# Altium PCB TYPEC_4KRECEIVER-v1.0.PcbDoc (part 3 of 12)
Units mil, origin at the board's own origin, x right, y up, seen from the top; angles counter-clockwise.
Board outline 2834.7 x 1259.84 mil, 10 copper layers (Top Layer, GND-1, Signal L1, GND-2, PWR-1, PWR-2, GND-3, Signal L2, GND-4, Bottom Layer), stack 61.686 mil thick; 492 components, 339 nets, 2214 pads, 1169 vias.
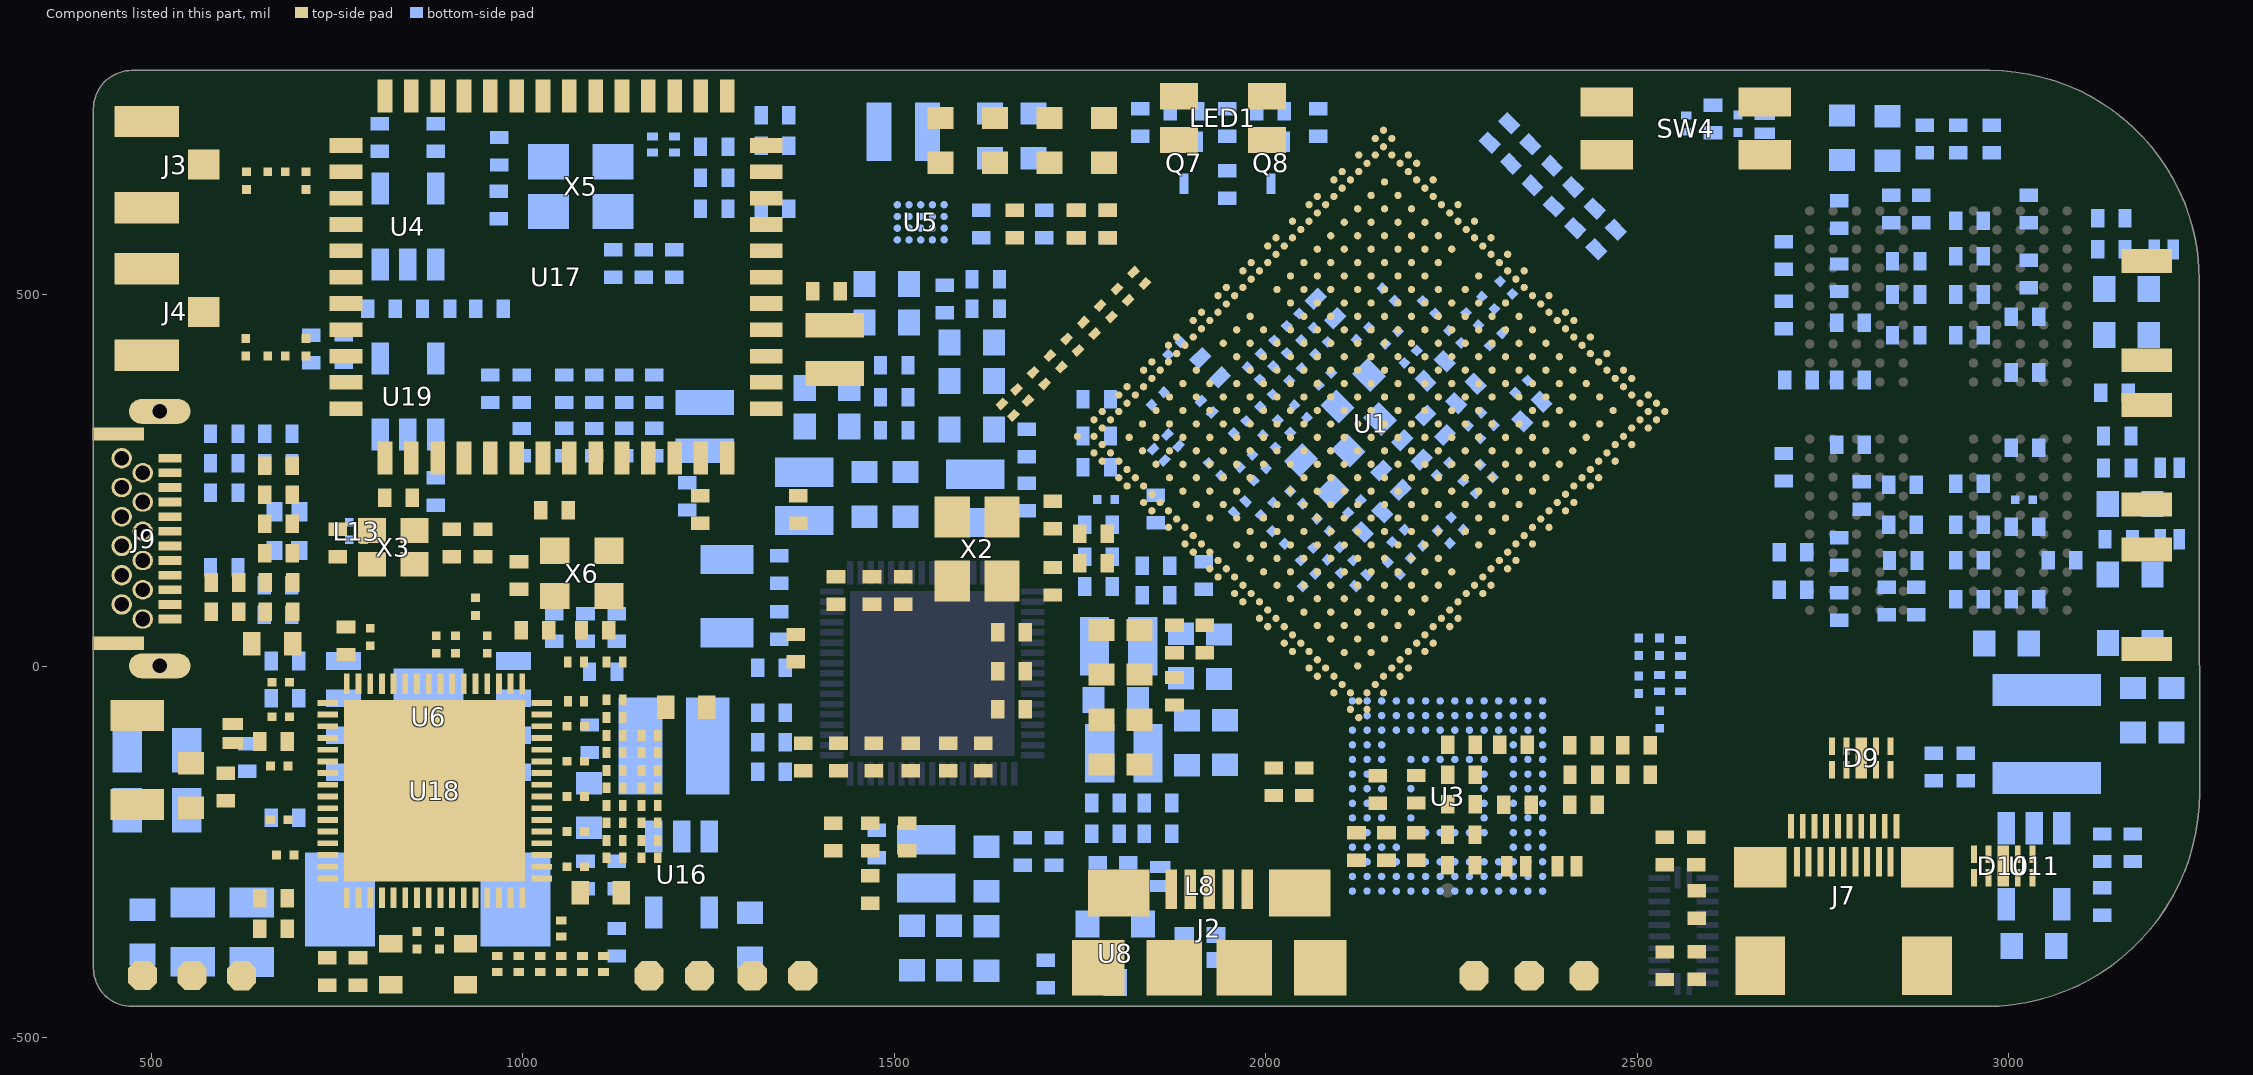
[diagram p10: the components of this part, seen from the top]

## Part data (continued)
C85: library part HGC0603R5226M160NTHJ, "16V 22uF X5R ±20% 0603 Multilayer Ceramic Capacitors MLCC - SMD/SMT ROHS", LCSC Part Number=C22367828, Manufacturer=Chinocera, Package=0603, ComponentLink1Description=LCSC, ComponentLink1URL=https://www.lcsc.com/product-detail/Multilayer-Ceramic-Capacitors-MLCC-SMD-SMT_Chinocera-HGC0603R5226M160NTHJ_C22367828.html, Item Type=Capacitor, Manufacturer Part Number=HGC0603R5226M160NTHJ
C121 C149 C169 C174: library part CC0201MRX5R6BB105, "CAP CER 1UF 10V X5R 0201", LCSC Part Number=C605210, Manufacturer=Yageo, Supplier Part Number=311-3474-1-ND, Category="Ceramic Capacitors", ComponentLink1Description=https://datasheet.octopart.com/CC0201MRX5R6BB105-Yageo-datasheet-158238148.pdf?src-supplier=Farnell, ComponentLink1URL=https://datasheet.octopart.com/CC0201MRX5R6BB105-Yageo-datasheet-158238148.pdf?src-supplier=Farnell, ComponentLink2Description=http://www.yageo.com/documents/recent/UPY-GPHC_X5R_4V-to-50V_25.pdf?src-supplier=Digi-Key, ComponentLink2URL=http://www.yageo.com/documents/recent/UPY-GPHC_X5R_4V-to-50V_25.pdf?src-supplier=Digi-Key, ComponentLink3Description=https://datasheet.octopart.com/CC0201MRX5R6BB105-Yageo-datasheet-137700082.pdf?src-supplier=Future+Electronics, ComponentLink3URL=https://datasheet.octopart.com/CC0201MRX5R6BB105-Yageo-datasheet-137700082.pdf?src-supplier=Future+Electronics, Item Type=Capacitor, Manufacturer Part Number=CC0201MRX5R6BB105, Pricing="1=0.19, 10=0.135, 50=0.0764, 100=0.0633, 500=0.04436, 1000=0.03672, 2500=0.03418, 5000=0.03127 (USD)", RoHS=Yes, Stock=772400, Supplier=Digi-Key
C129 C130: library part GCM1555C1H180GA16D, "CAP CER 18PF 50V C0G/NP0 0402", Case Code (Imperial)=0402, Case Code (Metric)=1005, LCSC Part Number=C882583, Manufacturer=Murata, Max Operating Temperature=125°C, Min Operating Temperature=-55°C, Ratings=AEC-Q200, Supplier Part Number=2477793P, Tolerance=2%, Voltage Rating=50V, Case/Package=0402, Category="Ceramic Capacitors", ComponentLink1Description=http://search.murata.co.jp/Ceramy/image/img/A01X/G101/ENG/GCM1555C1H180GA16-01.pdf?src-supplier=Digi-Key, ComponentLink1URL=http://search.murata.co.jp/Ceramy/image/img/A01X/G101/ENG/GCM1555C1H180GA16-01.pdf?src-supplier=Digi-Key, ComponentLink2Description=https://search.murata.co.jp/Ceramy/image/img/A01X/G101/ENG/GCM1555C1H180GA16-01.pdf?src-supplier=Digi-Key, ComponentLink2URL=https://search.murata.co.jp/Ceramy/image/img/A01X/G101/ENG/GCM1555C1H180GA16-01.pdf?src-supplier=Digi-Key, ComponentLink3Description=https://datasheet.octopart.com/GCM1555C1H180GA16D-Murata-datasheet-149522315.pdf?src-supplier=Newark, ComponentLink3URL=https://datasheet.octopart.com/GCM1555C1H180GA16D-Murata-datasheet-149522315.pdf?src-supplier=Newark, ComponentLink4Description=https://datasheet.octopart.com/GCM1555C1H180GA16D-Murata-datasheet-12511495.pdf?src-supplier=TME, ComponentLink4URL=https://datasheet.octopart.com/GCM1555C1H180GA16D-Murata-datasheet-12511495.pdf?src-supplier=TME, Item Type=Capacitor, Manufacturer Part Number=GCM1555C1H180GA16D, Mounting Technology="Surface Mount", Packaging="Cut Tape", Pricing="500=0.013, 5000=0.009 (GBP)", RoHS=Yes, RoHS Compliant=Yes, Series=GCM, Stock=10000, Supplier=Rs
C138: library part CC0402JRX7R7BB104, "CAP CER 0.1UF 16V X7R 0402", Case Code (Imperial)=0402, Case Code (Metric)=1005, Dielectric=X7R, LCSC Part Number=C541464, Manufacturer=Yageo, Max Operating Temperature=125°C, Min Operating Temperature=-55°C, Package Quantity=10000, Supplier Part Number=311-1676-1-ND, Tolerance=5%, Voltage Rating=16V, Case/Package=0402, Category="Ceramic Capacitors", ComponentLink1Description=https://datasheet.ciiva.com/13210/upy-gphc-x7r-6-3v-to-50v-8-12304-13210152.pdf?src-supplier=Mouser, ComponentLink1URL=https://datasheet.ciiva.com/13210/upy-gphc-x7r-6-3v-to-50v-8-12304-13210152.pdf?src-supplier=Mouser, Construction=Flat, Halogen Free="Halogen Free", Height=0.5mm, Item Type=Capacitor, Lead Free="Lead Free", Length=0.039inch, Manufacturer Part Number=CC0402JRX7R7BB104, Material=4241ConductorMaterial, Mounting Technology="Surface Mount", Packaging="Tape and Reel", Pricing="1=0.1, 10=0.046, 50=0.0262, 100=0.0203, 500=0.01528, 1000=0.012, 2500=0.01091, 5000=0.01004 (USD)", RoHS=Yes, RoHS Compliant=Yes, Series=CC, Stock=1659111, Supplier=Digikey, Thickness=0.022inch, Voltage Rating (DC)=16V, Width=0.02inch
C139 C142: library part CC0402KRX5R5BB475, "CAP CER 4.7UF 6.3V X5R 0402", Case/Package=0402, Dielectric=X5R, LCSC Part Number=C541466, Manufacturer=Yageo, Tolerance=10%, Voltage Rating (DC)=6.3V, Capacitance=4.7uF, Category="Ceramic Capacitors", ComponentLink1Description=http://www.yageo.com/documents/recent/UPY-GPHC_X5R_4V-to-50V_25.pdf?src-supplier=Digi-Key, ComponentLink1URL=http://www.yageo.com/documents/recent/UPY-GPHC_X5R_4V-to-50V_25.pdf?src-supplier=Digi-Key, ComponentLink2Description=https://www.yageo.com/upload/media/product/productsearch/datasheet/mlcc/UPY-GPHC_X5R_4V-to-50V_26.pdf?src-supplier=Digi-Key, ComponentLink2URL=https://www.yageo.com/upload/media/product/productsearch/datasheet/mlcc/UPY-GPHC_X5R_4V-to-50V_26.pdf?src-supplier=Digi-Key, Halogen Free="Halogen Free", Item Type=Capacitor, Lead Free="Lead Free", Manufacturer Part Number=CC0402KRX5R5BB475, Pricing 1="10000=0.02120, 20000=0.02030, 30000=0.02010, 50000=0.01930, 100000=0.01760, 250000=0.01630 (USD)", RoHS=Yes, RoHS Compliant=Yes, Stock 1=890000, Supplier 1="Arrow Electronics", Supplier Part Number 1=CC0402KRX5R5BB475
C156 C157 C158 C159: library part 0201B102K500NT, "50V 1nF X7R ±10% 0201 Multilayer Ceramic Capacitors MLCC - SMD/SMT ROHS", LCSC Part Number=C66942, Manufacturer=FH, ComponentLink1Description=LCSC, ComponentLink1URL=https://www.lcsc.com/product-detail/Multilayer-Ceramic-Capacitors-MLCC-SMD-SMT_FH-Guangdong-Fenghua-Advanced-Tech-0201B102K500NT_C66942.html, Item Type=Capacitor, Manufacturer Part Number=0201B102K500NT
C164 C166: library part GRM155R71H104ME14D, "CAP CER 0.1UF 50V X7R 0402", Capacitance=100nF, Case/Package=0402, LCSC Part Number=C182412, Manufacturer=Murata, Max Operating Temperature=125°C, Min Operating Temperature=-55°C, Tolerance=20%, Voltage Rating=50V, Category="Ceramic Capacitors", ComponentLink1Description=http://www.mouser.com/ds/2/281/c02e-2905.pdf?src-supplier=Mouser, ComponentLink1URL=http://www.mouser.com/ds/2/281/c02e-2905.pdf?src-supplier=Mouser, ComponentLink2Description=http://search.murata.co.jp/Ceramy/image/img/A01X/G101/ENG/GRM155R71H104ME14-01.pdf?src-supplier=Digi-Key, ComponentLink2URL=http://search.murata.co.jp/Ceramy/image/img/A01X/G101/ENG/GRM155R71H104ME14-01.pdf?src-supplier=Digi-Key, ComponentLink3Description=http://psearch.en.murata.com/capacitor/product/GRM155R71H104ME14%23.pdf?src-supplier=Avnet, ComponentLink3URL=http://psearch.en.murata.com/capacitor/product/GRM155R71H104ME14%23.pdf?src-supplier=Avnet, Item Type=Capacitor, Length=0.039inch, Manufacturer Part Number=GRM155R71H104ME14D, Mount="Surface Mount", Packaging="Cut Tape", Pricing 1="10000=0.00444, 20000=0.00420, 40000=0.00396, 60000=0.00372, 80000=0.00348, 100000=0.00324, 1000000=0.00300 (USD)", RoHS=Yes, RoHS Compliant=Yes, Stock 1=100000, Supplier 1=Avnet, Supplier Part Number 1=GRM155R71H104ME14D, Thickness=0.022inch, Width=0.02inch
C182 C183 C184 C185: library part CC0201JRNPO9BN150, "CAP CER 15PF 50V C0G/NPO 0201", LCSC Part Number=C277480, Manufacturer=Yageo, Supplier Part Number=2580314, Category="Ceramic Capacitors", ComponentLink1Description=https://datasheet.ciiva.com/176/mlccorderingcode-176501.pdf?src-supplier=Digi-Key, ComponentLink1URL=https://datasheet.ciiva.com/176/mlccorderingcode-176501.pdf?src-supplier=Digi-Key, ComponentLink2Description=https://datasheet.ciiva.com/176/mlccorderingcode-176502.pdf?src-supplier=Digi-Key, ComponentLink2URL=https://datasheet.ciiva.com/176/mlccorderingcode-176502.pdf?src-supplier=Digi-Key, ComponentLink3Description=https://datasheet.ciiva.com/176/mlccorderingcode-176503.pdf?src-supplier=Digi-Key, ComponentLink3URL=https://datasheet.ciiva.com/176/mlccorderingcode-176503.pdf?src-supplier=Digi-Key, ComponentLink4Description=https://datasheet.ciiva.com/17205/upy-gp-np0-16v-to-50v-8-17205625.pdf?src-supplier=Future+Electronics, ComponentLink4URL=https://datasheet.ciiva.com/17205/upy-gp-np0-16v-to-50v-8-17205625.pdf?src-supplier=Future+Electronics, Item Type=Capacitor, Manufacturer Part Number=CC0201JRNPO9BN150, Pricing="15000=0.0012, 60000=0.0011, 225000=0.0011, 600000=0.001, 1500000=0.001 (USD)", RoHS=Yes, Stock=585000, Supplier="Future Electronics"
C238: library part GRM1555C1H102JA01D, "CAP CER 1000PF 50V C0G/NP0 0402", Capacitance=1nF, Case Code (Imperial)=0402, Case Code (Metric)=1005, Dielectric=C0G, Dielectric Material=Ceramic, Insulation Resistance=10GR, LCSC Part Number=C76947, Manufacturer=Murata, Max Operating Temperature=125°C, Min Operating Temperature=-55°C, Package Quantity=1, Temperature Coefficient=30ppm/°C, Tolerance=5%, Voltage=50V, Case/Package=0402, Category="Ceramic Capacitors", ComponentLink1Description=https://datasheet.ciiva.com/34302/1855908-34302849.pdf?src-supplier=Jameco, ComponentLink1URL=https://datasheet.ciiva.com/34302/1855908-34302849.pdf?src-supplier=Jameco, ComponentLink2Description=https://datasheet.ciiva.com/132/product-132800.pdf?src-supplier=Digi-Key, ComponentLink2URL=https://datasheet.ciiva.com/132/product-132800.pdf?src-supplier=Digi-Key, ComponentLink3Description=https://datasheet.ciiva.com/132/grm1555c1h102ja01-01-132799.pdf?src-supplier=Digi-Key, ComponentLink3URL=https://datasheet.ciiva.com/132/grm1555c1h102ja01-01-132799.pdf?src-supplier=Digi-Key, ComponentLink4Description=https://datasheet.ciiva.com/11786/0900766b807a1cab-11786727.pdf?src-supplier=RSComponents, ComponentLink4URL=https://datasheet.ciiva.com/11786/0900766b807a1cab-11786727.pdf?src-supplier=RSComponents, ComponentLink5Description=https://datasheet.ciiva.com/29200/453569-da-01-en-vs-kondensator-0402-29200121.pdf?src-supplier=Conrad, ComponentLink5URL=https://datasheet.ciiva.com/29200/453569-da-01-en-vs-kondensator-0402-29200121.pdf?src-supplier=Conrad, ComponentLink6Description=https://datasheet.ciiva.com/7828/4360-7828821.pdf?src-supplier=Element14, ComponentLink6URL=https://datasheet.ciiva.com/7828/4360-7828821.pdf?src-supplier=Element14, ComponentLink7Description=https://datasheet.ciiva.com/14116/grmseries-tc-hitype-eng-14116919.pdf?src-supplier=Distrelec, ComponentLink7URL=https://datasheet.ciiva.com/14116/grmseries-tc-hitype-eng-14116919.pdf?src-supplier=Distrelec, ComponentLink8Description=https://datasheet.ciiva.com/14116/grmseries-tc-hitype-eng-14116858.pdf?src-supplier=Distrelec, ComponentLink8URL=https://datasheet.ciiva.com/14116/grmseries-tc-hitype-eng-14116858.pdf?src-supplier=Distrelec, ComponentLink9Description=https://datasheet.ciiva.com/132/grm1555c1h102ja01-01-132801.pdf?src-supplier=Digi-Key, ComponentLink9URL=https://datasheet.ciiva.com/132/grm1555c1h102ja01-01-132801.pdf?src-supplier=Digi-Key, ComponentLink10Description=https://datasheet.ciiva.com/7828/1747436-7828822.pdf?src-supplier=Element14, ComponentLink10URL=https://datasheet.ciiva.com/7828/1747436-7828822.pdf?src-supplier=Element14, Construction=Flat, Depth=0.5mm, Height=0.5mm, Item Type=Capacitor, Lead Free="Lead Free", Length=1mm, Manufacturer Part Number=GRM1555C1H102JA01D, Material=Ceramic, Mount="Surface Mount", Number of Pins=2, Packaging="Tape and Reel", Pricing 1="10000=0.00648, 20000=0.00613, 40000=0.00578, 60000=0.00543, 80000=0.00508, 100000=0.00473, 1000000=0.00438 (USD)", Radiation Hardening=No, Reach SVHC Compliant=Yes, RoHS=Yes, RoHS Compliant=Yes, Series=GRM, Size=0.5mm, Stock 1=800000, Supplier 1=Avnet, Supplier Part Number 1=GRM1555C1H102JA01D, Termination=SMD/SMT, Thickness=0.022inch, Voltage Rating=50V, Voltage Rating (DC)=50V, Width=0.5mm
C254: library part GRM1555C1H101JA01D, "CAP CER 100PF 50V C0G/NP0 0402", Case Code (Imperial)=0402, Case Code (Metric)=1005, Dielectric=C0G, LCSC Part Number=C77177, Manufacturer=Murata, Max Operating Temperature=125°C, Min Operating Temperature=-55°C, Package Quantity=1, Supplier Part Number 1=81-GRM1555C1H101JA1D, Tolerance=5%, Voltage=50V, Capacitance=100pF, Case/Package=0402, Category="Ceramic Capacitors", ComponentLink1Description=https://datasheet.ciiva.com/11786/0900766b80ef921d-11786069.pdf?src-supplier=RSComponents, ComponentLink1URL=https://datasheet.ciiva.com/11786/0900766b80ef921d-11786069.pdf?src-supplier=RSComponents, ComponentLink2Description=https://datasheet.ciiva.com/18184/getdatasheetpartid-199957-18184175.pdf?src-supplier=Verical, ComponentLink2URL=https://datasheet.ciiva.com/18184/getdatasheetpartid-199957-18184175.pdf?src-supplier=Verical, ComponentLink3Description=https://datasheet.ciiva.com/29200/453557-da-01-en-vs-kondensator-0402-29200111.pdf?src-supplier=Conrad, ComponentLink3URL=https://datasheet.ciiva.com/29200/453557-da-01-en-vs-kondensator-0402-29200111.pdf?src-supplier=Conrad, ComponentLink4Description=https://datasheet.ciiva.com/6271/partnumbering-e-01-6271071.pdf?src-supplier=Digi-Key, ComponentLink4URL=https://datasheet.ciiva.com/6271/partnumbering-e-01-6271071.pdf?src-supplier=Digi-Key, ComponentLink5Description=https://datasheet.ciiva.com/16440/product-16440566.pdf?src-supplier=Future+Electronics, ComponentLink5URL=https://datasheet.ciiva.com/16440/product-16440566.pdf?src-supplier=Future+Electronics, Construction=Flat, Depth=0.5mm, Height=0.5mm, Lead Free="Lead Free", Length=1mm, Manufacturer Part Number=GRM1555C1H101JA01D, Material=Ceramic, Mount="Surface Mount", Packaging="Tape and Reel", Pricing 1="1=0.10000, 10=0.01000, 50=0.01000, 100=0.00900, 500=0.00600, 1000=0.00500, 2500=0.00400, 10000=0.00300, 50000=0.00200 (USD)", Radiation Hardening=No, REACH SVHC="No SVHC", RoHS=Yes, RoHS Compliant=Yes, Series=GRM, Stock 1=2073105, Supplier 1=Mouser, Termination=SMD/SMT, Thickness=0.022inch, Voltage Rating=50V, Voltage Rating (DC)=50V, Width=0.02inch
C273 C275: library part GJM1555C1H120GB01D, "CAP CER 12PF 50V C0G/NP0 0402", Case Code (Imperial)=0402, Case Code (Metric)=1005, Dielectric=C0G, LCSC Part Number=C161305, Manufacturer=Murata, Max Operating Temperature=125°C, Min Operating Temperature=-55°C, Package Quantity=10000, Supplier Part Number 1=490-8078-1-ND, Tolerance=2%, Voltage Rating=50V, Capacitance=12pF, Case/Package=0402, Category="Ceramic Capacitors", ComponentLink1Description=https://datasheet.ciiva.com/11608/product-11608208.pdf?src-supplier=Avnet, ComponentLink1URL=https://datasheet.ciiva.com/11608/product-11608208.pdf?src-supplier=Avnet, ComponentLink2Description=https://datasheet.ciiva.com/29542/partnumbering-e-01-29542716.pdf?src-supplier=Digi-Key, ComponentLink2URL=https://datasheet.ciiva.com/29542/partnumbering-e-01-29542716.pdf?src-supplier=Digi-Key, ComponentLink3Description=https://datasheet.ciiva.com/29542/partnumbering-e-01-29542715.pdf?src-supplier=Digi-Key, ComponentLink3URL=https://datasheet.ciiva.com/29542/partnumbering-e-01-29542715.pdf?src-supplier=Digi-Key, ComponentLink4Description=https://datasheet.ciiva.com/29542/partnumbering-e-01-29542717.pdf?src-supplier=Digi-Key, ComponentLink4URL=https://datasheet.ciiva.com/29542/partnumbering-e-01-29542717.pdf?src-supplier=Digi-Key, Construction=Flat, Depth=0.5mm, Height=0.5mm, Lead Free="Lead Free", Length=1mm, Manufacturer Part Number=GJM1555C1H120GB01D, Mount="Surface Mount", Packaging="Tape and Reel", Pricing 1="1=0.18000, 10=0.12600, 50=0.07560, 100=0.06390, 500=0.04370, 1000=0.03865, 2500=0.03698, 5000=0.03361 (USD)", Radiation Hardening=No, RoHS=Yes, RoHS Compliant=Yes, Series=GJM, Stock 1=266975, Supplier 1=Digi-Key, Termination=SMD/SMT, Thickness=0.022inch, Voltage Rating (DC)=50V, Width=0.5mm
C292: library part CC0402CRNPO9BN6R8, "CAP CER 6.8PF 50V C0G/NPO 0402", Case Code (Imperial)=0402, Case Code (Metric)=1005, Dielectric=C0G, Insulation Resistance=10GR, LCSC Part Number=C189470, Manufacturer=Yageo, Max Operating Temperature=125°C, Min Operating Temperature=-55°C, Supplier Part Number=3247368, Tolerance=2%, Voltage Rating=50V, Case/Package=0402, Category="Ceramic Capacitors", ComponentLink1Description=https://datasheet.ciiva.com/11587/upy-gp-np0-16v-to-50v-8-11587182.pdf?src-supplier=Avnet, ComponentLink1URL=https://datasheet.ciiva.com/11587/upy-gp-np0-16v-to-50v-8-11587182.pdf?src-supplier=Avnet, Construction=Flat, Depth=0.5mm, Height=0.5mm, Item Type=Capacitor, Length=1mm, Manufacturer Part Number=CC0402CRNPO9BN6R8, Mounting Technology="Surface Mount", Packaging="Tape and Reel", Pricing="10000=0.0024, 40000=0.0022, 150000=0.0021, 400000=0.002, 1000000=0.0019 (USD)", Radiation Hardening=No, RoHS=Yes, RoHS Compliant=Yes, Series=CC, Stock=200000, Supplier="Future Electronics", Termination=SMD/SMT, Voltage Rating (DC)=50V, Weight=2.3E-05oz, Width=0.5mm
C322 C323: library part CQ0402GRNPO9BN150, "CAP CER 15PF 50V C0G/NPO 0402", Case Code (Imperial)=0402, Case Code (Metric)=1005, Dielectric=C0G, LCSC Part Number=C577406, Manufacturer=Yageo, Max Operating Temperature=125°C, Min Operating Temperature=-55°C, Package Quantity=10000, Tolerance=2%, Voltage Rating=50V, Case/Package=0402, ComponentLink1Description=http://www.mouser.com/ds/2/447/UPY-High%20Q_NP0_16V-to-250V_11-533944.pdf?src-supplier=Mouser, ComponentLink1URL=http://www.mouser.com/ds/2/447/UPY-High%20Q_NP0_16V-to-250V_11-533944.pdf?src-supplier=Mouser, ComponentLink2Description=http://www.yageo.com/documents/recent/UPY-High%20Q_NP0_16V-to-250V_13.pdf?src-supplier=Digikey, ComponentLink2URL=http://www.yageo.com/documents/recent/UPY-High%20Q_NP0_16V-to-250V_13.pdf?src-supplier=Digikey, Item Type=Capacitors, Manufacturer Part Number=CQ0402GRNPO9BN150, Mounting Technology="Surface Mount", Packaging="Tape and Reel", Pricing="10000=0.04366 (USD)", RoHS=Yes, Series=CQ, Supplier=Digikey, Voltage Rating (DC)=50V, Weight=2.3E-05oz
D1 D2 D3 D4 D5 D8 D11 D31: "DFN1006-2(0402) ESD Protection Devices ROHS", LCSC Part Number=C2936977, Manufacturer="TECH PUBLIC", ComponentLink1Description=LCSC, ComponentLink1URL=https://www.lcsc.com/product-detail/span-style-background-color-ff0-ESD-span-Protection-Devices_TECH-PUBLIC-ESD5451N_C2936977.html, Manufacturer Part Number=ESD5451N
D6 D7: "DFN1006-2 ESD Protection Devices ROHS", LCSC Part Number=C2875160, Manufacturer="TECH PUBLIC", ComponentLink1Description=LCSC, ComponentLink1URL=https://www.lcsc.com/product-detail/span-style-background-color-ff0-ESD-span-Protection-Devices_TECH-PUBLIC-ESD9X5VU_C2875160.html, Manufacturer Part Number=ESD9X5VU
D9 D10: "4A@8/20us 12V 7V 5V Unidirectional DFN2510-10L TVS ROHS", LCSC Part Number=C153722, Manufacturer=WILLSEMI, Package=DFN2510-10L, ComponentLink1Description=LCSC, ComponentLink1URL=https://www.lcsc.com/product-detail/TVS_WILLSEMI-Will-Semicon-ESD5304D-10-TR_C153722.html, Item Type=Diode, Manufacturer Part Number=ESD5304D-10/TR
D29 D30: "4A@8/20us 15V 7V 5V Unidirectional DFN1006-2L TVS ROHS", LCSC Part Number=C239773, Manufacturer=WILLSEMI, Package=DFN1006-2L, ComponentLink1Description=LCSC, ComponentLink1URL=https://www.lcsc.com/product-detail/TVS_WILLSEMI-Will-Semicon-ESD5341N-2-TR_C239773.html, Item Type=Diode, Manufacturer Part Number=ESD5341N-2/TR
F1: "FUSE BRD MNT 5A 32VAC 75VDC 1206", LCSC Part Number=C187561, Manufacturer=Littelfuse, Supplier Part Number=1740294, Category=Fuses, ComponentLink1Description=https://datasheet.ciiva.com/1730/337915-1730547.pdf?src-supplier=Newark, ComponentLink1URL=https://datasheet.ciiva.com/1730/337915-1730547.pdf?src-supplier=Newark, ComponentLink2Description=https://datasheet.ciiva.com/7991/337915-7991910.pdf?src-supplier=Element14, ComponentLink2URL=https://datasheet.ciiva.com/7991/337915-7991910.pdf?src-supplier=Element14, ComponentLink3Description=https://datasheet.ciiva.com/299/littelfuse-fuse-458-series-299786.pdf?src-supplier=Digikey, ComponentLink3URL=https://datasheet.ciiva.com/299/littelfuse-fuse-458-series-299786.pdf?src-supplier=Digikey, ComponentLink4Description=https://datasheet.ciiva.com/299/littelfuse-fuse-458-series-299787.pdf?src-supplier=Digikey, ComponentLink4URL=https://datasheet.ciiva.com/299/littelfuse-fuse-458-series-299787.pdf?src-supplier=Digikey, ComponentLink5Description=https://datasheet.ciiva.com/299/littelfuse-fuse-458-series-299788.pdf?src-supplier=Digikey, ComponentLink5URL=https://datasheet.ciiva.com/299/littelfuse-fuse-458-series-299788.pdf?src-supplier=Digikey, Item Type=Fuse, Manufacturer Part Number=0458005.DR, Pricing="1=0.6241, 10=0.73892, 25=0.71895, 50=0.70003 (GBP)", RoHS=Yes, Stock=1005, Supplier=Rs
FB7 FB8 FB11 FB12 FB13: "FERRITE BEAD 70 OHM 0603 1LN", Case Code (Imperial)=0603, Case Code (Metric)=1608, Current Rating=4A, DC Resistance (DCR)=20mR, LCSC Part Number=C113031, Manufacturer=Murata, Max Operating Temperature=125°C, Min Operating Temperature=-55°C, Package Quantity=1, Test Frequency=100MHz, Tolerance=25%, Case/Package=0603, ComponentLink1Description=https://datasheet.ciiva.com/41449/001171727-da-01-en-chip-drossel0603-70r-4000ma-1-6x0-8mm-41449356.pdf?src-supplier=Conrad, ComponentLink1URL=https://datasheet.ciiva.com/41449/001171727-da-01-en-chip-drossel0603-70r-4000ma-1-6x0-8mm-41449356.pdf?src-supplier=Conrad, ComponentLink2Description=https://datasheet.ciiva.com/41449/001172316-da-01-en-drossel-0603-70r-1-6x0-8mm-10000st-41449678.pdf?src-supplier=Conrad, ComponentLink2URL=https://datasheet.ciiva.com/41449/001172316-da-01-en-drossel-0603-70r-1-6x0-8mm-10000st-41449678.pdf?src-supplier=Conrad, ComponentLink3Description=https://datasheet.ciiva.com/8021/5151-8021529.pdf?src-supplier=Element14, ComponentLink3URL=https://datasheet.ciiva.com/8021/5151-8021529.pdf?src-supplier=Element14, ComponentLink4Description=https://datasheet.ciiva.com/8021/5151-8021530.pdf?src-supplier=Element14, ComponentLink4URL=https://datasheet.ciiva.com/8021/5151-8021530.pdf?src-supplier=Element14, ComponentLink5Description=https://datasheet.ciiva.com/14122/blm-series-eng-tds-14122901.pdf?src-supplier=Distrelec, ComponentLink5URL=https://datasheet.ciiva.com/14122/blm-series-eng-tds-14122901.pdf?src-supplier=Distrelec, ComponentLink6Description=https://datasheet.ciiva.com/6212/l0110s0100blm18s-6212357.pdf?src-supplier=Digikey, ComponentLink6URL=https://datasheet.ciiva.com/6212/l0110s0100blm18s-6212357.pdf?src-supplier=Digikey, ComponentLink7Description=https://datasheet.ciiva.com/6212/l0110s0100blm18s-6212359.pdf?src-supplier=Digikey, ComponentLink7URL=https://datasheet.ciiva.com/6212/l0110s0100blm18s-6212359.pdf?src-supplier=Digikey, ComponentLink8Description=https://datasheet.ciiva.com/16420/l0110s0100blm18s-16420729.pdf?src-supplier=Future+Electronics, ComponentLink8URL=https://datasheet.ciiva.com/16420/l0110s0100blm18s-16420729.pdf?src-supplier=Future+Electronics, Core Material=Ferrite, DC Resistance-Max=20mR, Depth=0.8mm, ESR=20mR, Height=0.8mm, Impedance=70R, Item Type="Ferrite Beads", Lead Free="Lead Free", Length=1.6mm, Manufacturer Part Number=BLM18SG700TN1D, Material=Steel,Ferrite, Max Current Rating=4A, Max DC Current=4A, Number of Circuits=1, Number of Lines=1, Packaging="Tape and Reel", Pins=2, Pricing="1=0.13, 10=0.071, 50=0.071, 100=0.049, 1000=0.036, 10000=0.032 (USD)", Reach SVHC Compliant=No, RMS Current (Irms)=4A, RoHS=Yes, RoHS Compliant=Yes, Series=BLM18S, Stock=188572, Supplier=Mouser, Termination=SMD/SMT, Width=0.8mm
J2: "CONN RCPT USB2.0 MICRO B SMD R/A", Color=Black, Current Rating=1.8A, Flammability Rating="UL94 V-0", Insulation Resistance=1GR, LCSC Part Number=C132564, Manufacturer="Amphenol FCI", Max Operating Temperature=85°C, Max Voltage Rating (AC)=100V, Min Operating Temperature=-55°C, Package Quantity=1400, Supplier Part Number 1=609-4613-6-ND, ComponentLink1Description=https://cdn.amphenol-icc.com/media/wysiwyg/files/documentation/datasheet/inputoutput/io_usb_micro.pdf?src-supplier=Verical, ComponentLink1URL=https://cdn.amphenol-icc.com/media/wysiwyg/files/documentation/datasheet/inputoutput/io_usb_micro.pdf?src-supplier=Verical, ComponentLink2Description=http://www.amphenol-icc.com/media/wysiwyg/files/drawing/10118192.pdf?src-supplier=Digi-Key, ComponentLink2URL=http://www.amphenol-icc.com/media/wysiwyg/files/drawing/10118192.pdf?src-supplier=Digi-Key, ComponentLink3Description=https://cdn.amphenol-icc.com/media/wysiwyg/files/documentation/datasheet/inputoutput/io_usb_micro.pdf?src-supplier=Mouser, ComponentLink3URL=https://cdn.amphenol-icc.com/media/wysiwyg/files/documentation/datasheet/inputoutput/io_usb_micro.pdf?src-supplier=Mouser, Connector Type=USB,Receptacle, Contact Material="Copper Alloy", Contact Plating=Gold, Depth=5.57mm, Features=Shielded, Gender=Receptacle, Housing Material=Polymer, Item Type="USB Connector", Lead Free="Lead Free", Length=7.86mm, Manufacturer Part Number=10118192-0001LF, Mount="Surface Mount,Horizontal", Number of Contacts=5, Number of Ports=1, Number of Terminals=5, Orientation="Right Angle", Packaging="Tape and Reel", Pitch=0.65mm, Pricing 1="1=0.43, 10=0.405, 25=0.3648, 50=0.3242, 100=0.3107, 250=0.28368, 500=0.27016 (USD)", Radiation Hardening=No, REACH SVHC="No SVHC", Stock 1=32977, Supplier 1=Digi-Key, Termination=Solder, USB Standard="USB 2.0", Voltage Rating=100V
J3 J4: "CONN U.FL RCPT STR 50 OHM SMD", Case/Package=SMD/SMT, LCSC Part Number=C88374, Manufacturer=Hirose, Package Quantity=10000, Supplier Part Number 1=U.FL-R-SMT-1(80)-CUTT, ComponentLink1Description=https://www.hirose.com/product/en/download_file/key_name/U.FL-R-SMT-1%2880%29/category/Specification%20Sheet/doc_file_id/37638/?file_category_id=9&item_id=03310472280&is_series=&src-supplier=Digi-Key, ComponentLink1URL=https://www.hirose.com/product/en/download_file/key_name/U.FL-R-SMT-1%2880%29/category/Specification%20Sheet/doc_file_id/37638/?file_category_id=9&item_id=03310472280&is_series=&src-supplier=Digi-Key, ComponentLink2Description=http://www.mouser.com/ds/2/185/U.FL_catalog-939761.pdf?src-supplier=Mouser, ComponentLink2URL=http://www.mouser.com/ds/2/185/U.FL_catalog-939761.pdf?src-supplier=Mouser, Item Type="UFL Connector", Lead Free="Lead Free", Manufacturer Part Number=U.FL-R-SMT-1(80), Packaging="Tape and Reel", Pricing 1="1=1.07, 500=0.785, 1500=0.74, 2500=0.72, 5000=0.695 (USD)", Stock 1=1272, Supplier 1="Future Electronics"
J7: "SMD HDMI Connectors ROHS", LCSC Part Number=C720619, Manufacturer=XUNPU, Package=SMD, ComponentLink1Description=LCSC, ComponentLink1URL=https://www.lcsc.com/product-detail/HDMI-Connectors_XUNPU-HDMI-101W_C720619.html, Item Type=Connector, Manufacturer Part Number=HDMI-101W
J9: "5A USB 3.1 1 Horizontal attachment 24P Male -40℃~+85℃ Type-C SMD USB Connectors ROHS", LCSC Part Number=C2988370, Manufacturer=G-Switch, Package=SMD, ComponentLink1Description=LCSC, ComponentLink1URL=https://www.lcsc.com/product-detail/span-style-background-color-ff0-USB-span-Connectors_G-Switch-GT-USB-8013A_C2988370.html, Item Type=Connector, Manufacturer Part Number=GT-USB-8013A
L1 L9: library part WPN252012H2R2MTY01, "Fixed Ind 2.220%UH 0.085 Ohm 2700", LCSC Part Number=C279858, Manufacturer=Sunlord, Supplier Part Number 1=3442-WPN252012H2R2MTY01CT-ND, Category="Fixed Inductors", ComponentLink1Description=LCSC, ComponentLink1URL=https://www.lcsc.com/product-detail/Power-Inductors_Sunlord-WPN252012H2R2MTY01_C279858.html, Item Type=Inductor, Manufacturer Part Number=WPN252012H2R2MTY01, Pricing 1="1=0.46000, 10=0.40400, 25=0.37520, 50=0.31760, 100=0.28880, 250=0.27144, 500=0.24256, 1000=0.19635 (USD)", RoHS=Yes, Stock 1=1965, Supplier 1=Digi-Key
L2: library part WPN252012HR24MT, "4.05A 240nH ±20% 19mΩ SMD Power Inductors ROHS", LCSC Part Number=C305274, Manufacturer=Sunlord, ComponentLink1Description=LCSC, ComponentLink1URL=https://www.lcsc.com/product-detail/Power-Inductors_Sunlord-WPN252012HR24MT_C305274.html, Item Type=Inductor, Manufacturer Part Number=WPN252012HR24MT
L3 L4 L5 L6 L7: library part WIP201610S-R47MLDG, "POWER INDUCTOR 2016 0.47UH 20% D", LCSC Part Number=C964108, Manufacturer="INPAQ TECHNOLOGY", Item Type=Inductor, Manufacturer Part Number=WIP201610S-R47MLDG, Pricing="1=0.1, 10=0.064, 25=0.0576, 50=0.0536, 100=0.0496, 250=0.04488, 500=0.0416, 1000=0.03854 (USD)", RoHS=No, Supplier=Digikey
L8 L13: "90Ω@100MHz 4Ω 2 0302 Common Mode Filters ROHS", LCSC Part Number=C370285, Manufacturer=Sunlord, Package=0302, ComponentLink1Description=LCSC, ComponentLink1URL=https://www.lcsc.com/product-detail/Common-Mode-Filters_Sunlord-SDMM0806H-2-900T_C370285.html, Item Type="Common Mode Filter", Manufacturer Part Number=SDMM0806H-2-900T
L10: library part WPN4020H2R2MT, "Fixed Ind 2.2UH 4.3A 48MOHM SMD", LCSC Part Number=C98361, Manufacturer=Sunlord, Supplier Part Number 1=3442-WPN4020H2R2MTCT-ND, ComponentLink1Description=LCSC, ComponentLink1URL=https://www.lcsc.com/product-detail/Power-Inductors_Sunlord-WPN4020H2R2MT_C98361.html, Item Type=Inductor, Manufacturer Part Number=WPN4020H2R2MT, Pricing 1="1=0.84000, 10=0.73500, 25=0.68240, 50=0.57760, 100=0.52500, 250=0.49352, 500=0.44100, 1000=0.35700 (USD)", RoHS=No, Stock 1=1762, Supplier 1=Digi-Key
L11: library part SWPA3015S2R2MT, "2A 2.2uH ±20% SMD,3x3mm Power Inductors ROHS", LCSC Part Number=C43389, Manufacturer=Sunlord, Package=SMD,3x3mm, ComponentLink1Description=LCSC, ComponentLink1URL=https://www.lcsc.com/product-detail/Power-Inductors_Sunlord-SWPA3015S2R2MT_C43389.html, Item Type=Inductor, Manufacturer Part Number=SWPA3015S2R2MT
L12: library part 0630CDMCCDS-3R3MC, "FIXED IND 3.3UH 8.4A 22MOHM SMD", Case/Package=Nonstandard, Current Rating=8.4A, DC Resistance (DCR)=22mR, LCSC Part Number=C879414, Manufacturer=Sumida, Max Operating Temperature=125°C, Min Operating Temperature=-55°C, Saturation Current=11.4A, Test Frequency=100kHz, Tolerance=20%, ComponentLink1Description=http://products.sumida.com/products/pdf/0630CDMCDDS.pdf?src-supplier=Digikey, ComponentLink1URL=http://products.sumida.com/products/pdf/0630CDMCDDS.pdf?src-supplier=Digikey, ComponentLink2Description=https://products.sumida.com/products/pdf/0630CDMCDDS.pdf?src-supplier=Digikey, ComponentLink2URL=https://products.sumida.com/products/pdf/0630CDMCDDS.pdf?src-supplier=Digikey, ComponentLink3Description=https://datasheet.octopart.com/0630CDMCCDS-3R3MC-Sumida-datasheet-111071315.pdf?src-supplier=Future+Electronics, ComponentLink3URL=https://datasheet.octopart.com/0630CDMCCDS-3R3MC-Sumida-datasheet-111071315.pdf?src-supplier=Future+Electronics, Core Material=Metal, Height - Seated (Max)=0.118inch, Item Type=Inductor, Length=0.276inch, Manufacturer Part Number=0630CDMCCDS-3R3MC, Mounting Technology="Surface Mount", Packaging="Tape and Reel", Pricing="1=0.6, 10=0.51, 25=0.4632, 50=0.4354, 100=0.3614, 250=0.33356, 500=0.32624 (USD)", RoHS=Yes, RoHS Compliant=Yes, Series=0630CDMC/DS, Shielding=Shielded, Stock=66218, Supplier=Digikey, Width=0.26inch
LED1: "30mA Colorless transparent lens -30℃~+85℃ Positive Stick Common Anode Red,Blue 120° 90mW SMD3528 LED Indication - Discrete ROHS", LCSC Part Number=C2843811, Manufacturer=XINGLIGHT, Item Type=LED, Manufacturer Part Number=XL-3528SURUBC, Supplier=LCSC
Q7 Q8: "Small Signal Bipolar Transistor, 0.6A I(C), 40V V(BR)CEO, 1-Element, NPN, Silicon", Manufacturer="ON Semiconductor", Supplier Part Number=MMBT2222ATT3GOSCT-ND, Category=BJTs, ComponentLink1Description=https://datasheet.ciiva.com/980/mmbt2222lt1-d-980718.pdf?src-supplier=Digikey, ComponentLink1URL=https://datasheet.ciiva.com/980/mmbt2222lt1-d-980718.pdf?src-supplier=Digikey, ComponentLink2Description=https://datasheet.ciiva.com/4724/mmbt2222att1-d-81771-4724629.pdf?src-supplier=Mouser, ComponentLink2URL=https://datasheet.ciiva.com/4724/mmbt2222att1-d-81771-4724629.pdf?src-supplier=Mouser, Manufacturer Part Number=MMBT2222ATT3G, Pricing="1=0.12, 10=0.082, 100=0.0441, 500=0.03466, 1000=0.02407, 2000=0.01994, 5000=0.01885 (USD)", RoHS=Yes, Stock=7029, Supplier=Digikey
R1 R17 R34 R41 R51 R89 R105 R106 R107 R109 R110: library part RC0402FR-0710KL, "RES 10K OHM 1% 1/16W 0402", Case Code (Imperial)=0402, Case Code (Metric)=1005, LCSC Part Number=C60490, Manufacturer=Yageo, Max Operating Temperature=155°C, Max Power Dissipation=63mW, Min Operating Temperature=-55°C, Power Rating=62.5mW, Resistance=10kR, Resistance Tolerance=1%, Resistor Type="Thick Film", Supplier Part Number 1=603-RC0402FR-0710KL, Temperature Coefficient=100ppm/°C, Voltage Rating=50V, Case/Package=0402, Category="Chip SMD Resistors", ComponentLink1Description=https://datasheet.ciiva.com/7660/38568-7660787.pdf?src-supplier=Element14, ComponentLink1URL=https://datasheet.ciiva.com/7660/38568-7660787.pdf?src-supplier=Element14, ComponentLink2Description=https://datasheet.ciiva.com/7849/1686128-7849814.pdf?src-supplier=Element14, ComponentLink2URL=https://datasheet.ciiva.com/7849/1686128-7849814.pdf?src-supplier=Element14, ComponentLink3Description=https://datasheet.ciiva.com/7983/1018594-7983486.pdf?src-supplier=Element14, ComponentLink3URL=https://datasheet.ciiva.com/7983/1018594-7983486.pdf?src-supplier=Element14, ComponentLink4Description=https://datasheet.ciiva.com/22747/1018594-22747512.pdf?src-supplier=Element14, ComponentLink4URL=https://datasheet.ciiva.com/22747/1018594-22747512.pdf?src-supplier=Element14, ComponentLink5Description=https://datasheet.ciiva.com/12667/pyu-rc0402-51-rohs-l-6-r-12667067.pdf?src-supplier=Mouser, ComponentLink5URL=https://datasheet.ciiva.com/12667/pyu-rc0402-51-rohs-l-6-r-12667067.pdf?src-supplier=Mouser, ComponentLink6Description=https://datasheet.ciiva.com/7849/1784430-7849813.pdf?src-supplier=Element14, ComponentLink6URL=https://datasheet.ciiva.com/7849/1784430-7849813.pdf?src-supplier=Element14, ComponentLink7Description=https://datasheet.ciiva.com/7849/1784430-7849815.pdf?src-supplier=Element14, ComponentLink7URL=https://datasheet.ciiva.com/7849/1784430-7849815.pdf?src-supplier=Element14, Construction=Rectangular, Depth=0.5mm, Features="Moisture Resistant", Height=0.32mm, Item Type=Resistor, Lead Free="Lead Free", Lead Pitch=0.2mm, Length=1mm, Manufacturer Part Number=RC0402FR-0710KL, Military Standard=Not, Number of Pins=2, Number of Terminations=2, Packaging="Tape and Reel", Pricing 1="1=0.10000, 10=0.01400, 50=0.01400, 100=0.00500, 1000=0.00300, 10000=0.00200 (USD)", REACH SVHC="No SVHC", RoHS=Yes, RoHS Compliant=Yes, Series=RC, Stock 1=18648329, Supplier 1=Mouser, Termination=SMD/SMT, Tolerance=1%, Voltage Rating (DC)=50V, Width=0.5mm, Working Voltage=50V
R2 R95: library part RC0402FR-0722RL, "RES 22 OHM 1% 1/16W 0402", Case Code (Imperial)=0402, Case Code (Metric)=1005, LCSC Part Number=C114765, Manufacturer=Yageo, Max Operating Temperature=155°C, Max Power Dissipation=63mW, Min Operating Temperature=-55°C, Power Rating=62.5mW, Resistance=22R, Resistance Tolerance=1%, Resistor Type="Thick Film", Temperature Coefficient=100ppm/°C, Voltage Rating=50V, Case/Package=0402, Category="Chip SMD Resistors", ComponentLink1Description=https://datasheet.ciiva.com/11819/0900766b80c66297-11819462.pdf?src-supplier=RSComponents, ComponentLink1URL=https://datasheet.ciiva.com/11819/0900766b80c66297-11819462.pdf?src-supplier=RSComponents, ComponentLink2Description=https://datasheet.ciiva.com/7849/1018594-7849912.pdf?src-supplier=Element14, ComponentLink2URL=https://datasheet.ciiva.com/7849/1018594-7849912.pdf?src-supplier=Element14, ComponentLink3Description=https://datasheet.ciiva.com/7849/1018594-7849911.pdf?src-supplier=Element14, ComponentLink3URL=https://datasheet.ciiva.com/7849/1018594-7849911.pdf?src-supplier=Element14, ComponentLink4Description=https://datasheet.ciiva.com/16930/pyu-rc0402-51-rohs-l-6-r-16930687.pdf?src-supplier=Future+Electronics, ComponentLink4URL=https://datasheet.ciiva.com/16930/pyu-rc0402-51-rohs-l-6-r-16930687.pdf?src-supplier=Future+Electronics, ComponentLink5Description=https://datasheet.ciiva.com/26829/getdatasheetpartid-554995-26829991.pdf?src-supplier=Verical, ComponentLink5URL=https://datasheet.ciiva.com/26829/getdatasheetpartid-554995-26829991.pdf?src-supplier=Verical, Construction=Rectangular, Depth=0.5mm, Features="Moisture Resistant", Height=0.32mm, Item Type=Resistor, Lead Free="Lead Free", Length=1mm, Manufacturer Part Number=RC0402FR-0722RL, Military Standard=Not, Number of Pins=2, Number of Terminations=2, Packaging="Tape and Reel", Pricing 1="10000=0.00085 (USD)", Reach SVHC Compliant=Yes, RoHS=Yes, RoHS Compliant=Yes, Series=RC, Size Code=0402, Stock 1=1810000, Supplier 1=Avnet, Supplier Part Number 1=RC0402FR-0722RL, Technology="THICK FILM", Termination=SMD/SMT, Tolerance=1%, Voltage Rating (DC)=50V, Width=0.5mm
R3 R29 R45 R50 R56 R87 R93 R114 R115 R116 R117 R126 R140 R169 R170 R171 R172 R173 R174 R175 R176: library part RC0402FR-070RL, "RES 0 OHM JUMPER 1/16W 0402", Case Code (Imperial)=0402, Case Code (Metric)=1005, LCSC Part Number=C106231, Manufacturer=Yageo, Max Operating Temperature=155°C, Max Power Dissipation=63mW, Min Operating Temperature=-55°C, Power Rating=62.5mW, Resistor Type="Thick Film", Supplier Part Number 1=603-RC0402FR-070RL, Temperature Coefficient=200ppm/°C, Tolerance=1%, Voltage Rating=50V, Case/Package=0402, ComponentLink1Description=https://datasheet.ciiva.com/8896/pyu-rc0402-51-rohs-l-6-8896149.pdf?src-supplier=Avnet, ComponentLink1URL=https://datasheet.ciiva.com/8896/pyu-rc0402-51-rohs-l-6-8896149.pdf?src-supplier=Avnet, ComponentLink2Description=https://datasheet.ciiva.com/16790/pyu-rc0402-51-rohs-l-6-r-16790444.pdf?src-supplier=Future+Electronics, ComponentLink2URL=https://datasheet.ciiva.com/16790/pyu-rc0402-51-rohs-l-6-r-16790444.pdf?src-supplier=Future+Electronics, Contact Plating=Tin,Matte, Features="Moisture Resistant", Height=0.35mm, Lead Free="Lead Free", Length=1mm, Manufacturer Part Number=RC0402FR-070RL, Mount="Surface Mount", Number of Terminations=2, Packaging="Tape and Reel", Pricing 1="1=0.10000, 10=0.01400, 50=0.01400, 100=0.00600, 1000=0.00300, 5000=0.00200, 10000=0.00100 (USD)", Radiation Hardening=No, Resistance=0R, RoHS=Yes, RoHS Compliant=Yes, Series=RC, Size Code=0402, Stock 1=8556842, Supplier 1=Mouser, Termination=SMD/SMT, Width=0.5mm
  R3 R45 R50 R140: Category="Chip SMD Resistors"
  R29 R56 R87 R93 R114 R115 R116 R117 R126 R169 R170 R171 R172 R173 R174 R175 R176: Item Type=Resistors
R4 R27 R99 R123: library part RC0402FR-0720KL, "RES 20K OHM 1% 1/16W 0402", Case Code (Imperial)=0402, Case Code (Metric)=1005, LCSC Part Number=C93942, Manufacturer=Yageo, Max Operating Temperature=155°C, Max Power Dissipation=63mW, Min Operating Temperature=-55°C, Package Quantity=1, Power Rating=62.5mW, Resistance=20kR, Resistance Tolerance=1%, Resistor Type="Thick Film", Temperature Coefficient=100ppm/°C, Voltage Rating=50V, Case/Package=0402, Category="Chip SMD Resistors", ComponentLink1Description=https://datasheet.ciiva.com/11808/0900766b80c66297-11808454.pdf?src-supplier=RSComponents, ComponentLink1URL=https://datasheet.ciiva.com/11808/0900766b80c66297-11808454.pdf?src-supplier=RSComponents, ComponentLink2Description=https://datasheet.ciiva.com/7983/1018594-7983511.pdf?src-supplier=Element14, ComponentLink2URL=https://datasheet.ciiva.com/7983/1018594-7983511.pdf?src-supplier=Element14, ComponentLink3Description=https://datasheet.ciiva.com/46394/1018594-46394974.pdf?src-supplier=Element14, ComponentLink3URL=https://datasheet.ciiva.com/46394/1018594-46394974.pdf?src-supplier=Element14, ComponentLink4Description=https://datasheet.ciiva.com/2453/pyu-r-int-thick-7-2453494.pdf?src-supplier=Digi-Key, ComponentLink4URL=https://datasheet.ciiva.com/2453/pyu-r-int-thick-7-2453494.pdf?src-supplier=Digi-Key, ComponentLink5Description=https://datasheet.ciiva.com/2453/pyu-r-int-thick-7-2453495.pdf?src-supplier=Digi-Key, ComponentLink5URL=https://datasheet.ciiva.com/2453/pyu-r-int-thick-7-2453495.pdf?src-supplier=Digi-Key, ComponentLink6Description=https://datasheet.ciiva.com/2453/pyu-r-int-thick-7-2453493.pdf?src-supplier=Digi-Key, ComponentLink6URL=https://datasheet.ciiva.com/2453/pyu-r-int-thick-7-2453493.pdf?src-supplier=Digi-Key, ComponentLink7Description=https://datasheet.ciiva.com/12558/pyu-rc0402-51-rohs-l-6-r-8721-12558796.pdf?src-supplier=Mouser, ComponentLink7URL=https://datasheet.ciiva.com/12558/pyu-rc0402-51-rohs-l-6-r-8721-12558796.pdf?src-supplier=Mouser, Construction=Rectangular, Depth=0.5mm, Features="Moisture Resistant", Height=0.016inch, Item Type=Resistor, Lead Free="Lead Free", Length=1mm, Manufacturer Part Number=RC0402FR-0720KL, Military Standard=Not, Number of Pins=2, Number of Terminations=2, Packaging="Tape and Reel", Pricing 1="10000=0.00085 (USD)", Reach SVHC Compliant=Yes, RoHS=Yes, RoHS Compliant=Yes, Series=RC, Size Code=0402, Stock 1=1960708, Supplier 1=Avnet, Supplier Part Number 1=RC0402FR-0720KL, Technology="THICK FILM", Termination=SMD/SMT, Tolerance=1%, Voltage Rating (DC)=50V, Width=0.02inch
R5 R42 R86 R94 R132 R152 R153: library part RC0402FR-07100KL, "RES 100K OHM 1% 1/16W 0402", Case Code (Imperial)=0402, Case Code (Metric)=1005, LCSC Part Number=C60491, Manufacturer=Yageo, Max Operating Temperature=155°C, Max Power Dissipation=63mW, Min Operating Temperature=-55°C, Package Quantity=1, Resistance=100kR, Resistance Tolerance=1%, Resistor Type="Thick Film", Supplier Part Number 1=603-RC0402FR-07100KL, Temperature Coefficient=100ppm/°C, Voltage Rating=50V, Case/Package=0402, Category="Chip SMD Resistors", ComponentLink1Description=https://datasheet.ciiva.com/11819/0900766b80c66297-11819452.pdf?src-supplier=RSComponents, ComponentLink1URL=https://datasheet.ciiva.com/11819/0900766b80c66297-11819452.pdf?src-supplier=RSComponents, ComponentLink2Description=https://datasheet.ciiva.com/22747/1018594-22747509.pdf?src-supplier=Element14, ComponentLink2URL=https://datasheet.ciiva.com/22747/1018594-22747509.pdf?src-supplier=Element14, ComponentLink3Description=https://datasheet.ciiva.com/2453/pyu-r-int-thick-7-2453362.pdf?src-supplier=Digi-Key, ComponentLink3URL=https://datasheet.ciiva.com/2453/pyu-r-int-thick-7-2453362.pdf?src-supplier=Digi-Key, ComponentLink4Description=https://datasheet.ciiva.com/2453/pyu-r-int-thick-7-2453363.pdf?src-supplier=Digi-Key, ComponentLink4URL=https://datasheet.ciiva.com/2453/pyu-r-int-thick-7-2453363.pdf?src-supplier=Digi-Key, ComponentLink5Description=https://datasheet.ciiva.com/2453/pyu-r-int-thick-7-2453361.pdf?src-supplier=Digi-Key, ComponentLink5URL=https://datasheet.ciiva.com/2453/pyu-r-int-thick-7-2453361.pdf?src-supplier=Digi-Key, ComponentLink6Description=https://datasheet.ciiva.com/12667/pyu-rc0402-51-rohs-l-6-r-12667930.pdf?src-supplier=Mouser, ComponentLink6URL=https://datasheet.ciiva.com/12667/pyu-rc0402-51-rohs-l-6-r-12667930.pdf?src-supplier=Mouser, ComponentLink7Description=https://datasheet.ciiva.com/15189/getdatasheetpartid-323696-15189334.pdf?src-supplier=Verical, ComponentLink7URL=https://datasheet.ciiva.com/15189/getdatasheetpartid-323696-15189334.pdf?src-supplier=Verical, Construction=Rectangular, Depth=0.5mm, Features="Moisture Resistant", Height=0.016inch, Item Type=Resistor, Lead Free="Lead Free", Length=0.039inch, Manufacturer Part Number=RC0402FR-07100KL, Military Standard=Not, Number of Terminations=2, Packaging="Tape and Reel", Power Rating=63mW, Pricing 1="1=0.10000, 10=0.01200, 50=0.01200, 100=0.00500, 1000=0.00300, 2500=0.00200, 10000=0.00100 (USD)", REACH SVHC="No SVHC", RoHS=Yes, RoHS Compliant=Yes, Series=RC, Stock 1=7759549, Supplier 1=Mouser, Technology="THICK FILM", Termination=SMD/SMT, Tolerance=1%, Width=0.02inch, Working Voltage=50V
R6 R7: library part RC0402FR-072K2L, "RES SMD 2.2K OHM 1% 1/16W 0402", Case Code (Imperial)=0402, Case Code (Metric)=1005, LCSC Part Number=C114762, Manufacturer=Yageo, Max Operating Temperature=155°C, Max Power Dissipation=63mW, Min Operating Temperature=-55°C, Resistance=2.2kR, Resistance Tolerance=1%, Resistor Type="Thick Film", Supplier Part Number 1=311-2.20KLRCT-ND, Temperature Coefficient=100ppm/°C, Voltage Rating=50V, Case/Package=0402, ComponentLink1Description=http://www.farnell.com/datasheets/2167052.pdf?src-supplier=Element14, ComponentLink1URL=http://www.farnell.com/datasheets/2167052.pdf?src-supplier=Element14, ComponentLink2Description=http://www.yageo.com/documents/recent/PYu-RC_Group_51_RoHS_L_9.pdf?src-supplier=Mouser, ComponentLink2URL=http://www.yageo.com/documents/recent/PYu-RC_Group_51_RoHS_L_9.pdf?src-supplier=Mouser, ComponentLink3Description=http://documents.rs-components.com/techlib://itc_doclist_GB.htm?stockno=6186532&src-supplier=RSComponents, ComponentLink3URL=http://documents.rs-components.com/techlib://itc_doclist_GB.htm?stockno=6186532&src-supplier=RSComponents, ComponentLink4Description=http://www.yageo.com/documents/recent/PYu-RC0402_51_RoHS_L_6_r.pdf?src-supplier=Future+Electronics, ComponentLink4URL=http://www.yageo.com/documents/recent/PYu-RC0402_51_RoHS_L_6_r.pdf?src-supplier=Future+Electronics, Construction=Rectangular, Depth=0.5mm, Features="Moisture Resistant", Height=0.35mm, Lead Free="Lead Free", Length=1mm, Manufacturer Part Number=RC0402FR-072K2L, Military Standard=Not, Number of Terminations=2, Packaging="Tape and Reel", Power Rating=63mW, Pricing 1="1=0.1, 10=0.016, 100=0.0066, 1000=0.00299, 2500=0.00259, 5000=0.00214 (USD)", REACH SVHC=Unknown, RoHS Compliant=Yes, Series=RC, Size Code=0402, Stock 1=966157, Supplier 1=Digi-Key, Technology="THICK FILM", Termination=SMD/SMT, Tolerance=1%, Weight=2.3E-05oz, Width=0.5mm
R8: library part RC0402FR-0733KL, "RES 33K OHM 1% 1/16W 0402", LCSC Part Number=C138003, Manufacturer=YAGEO, Package=0402, ComponentLink1Description=LCSC, ComponentLink1URL=https://www.lcsc.com/product-detail/Chip-Resistor-Surface-Mount_YAGEO-RC0402FR-0733KL_C138003.html, Item Type=Resistor, Manufacturer Part Number=RC0402FR-0733KL
R9 R22 R60 R61 R62 R63 R82 R111 R112 R119 R120 R121 R122: library part RC0201FR-0710KL, "RES SMD 10K OHM 1% 1/20W 0201", LCSC Part Number=C106225, Manufacturer=Yageo, Package=0201, ComponentLink7Description=LCSC, ComponentLink7URL=https://www.lcsc.com/product-detail/Chip-Resistor-Surface-Mount_YAGEO-RC0201FR-0710KL_C106225.html, Item Type=Resistor, Manufacturer Part Number=RC0201FR-0710KL
R10: library part RC0201FR-0722RL, "RES 22 OHM 1% 1/20W 0201", LCSC Part Number=C155743, Manufacturer=Yageo, Supplier Part Number=5973409, Category="Chip SMD Resistors", ComponentLink1Description=https://datasheet.ciiva.com/7672/1563626-7672215.pdf?src-supplier=Element14, ComponentLink1URL=https://datasheet.ciiva.com/7672/1563626-7672215.pdf?src-supplier=Element14, Item Type=Resistor, Manufacturer Part Number=RC0201FR-0722RL, Pricing="10000=0.0014, 50000=0.0013, 250000=0.0013, 750000=0.0012, 2000000=0.0011 (USD)", RoHS=Yes, Stock=17980000, Supplier="Future Electronics"